# Altium PCB PCB.PcbDoc (part 2 of 4)
Units mm, origin at the board's own origin, x right, y up, seen from the top; angles counter-clockwise.
Board outline 147.57 x 62.6 mm, 4 copper layers (Top Layer, Layer 1, Layer 2, Bottom Layer), stack 1.586 mm thick; 192 components, 139 nets, 594 pads, 161 vias.
Unrouted connection lines stored in the file: 1.
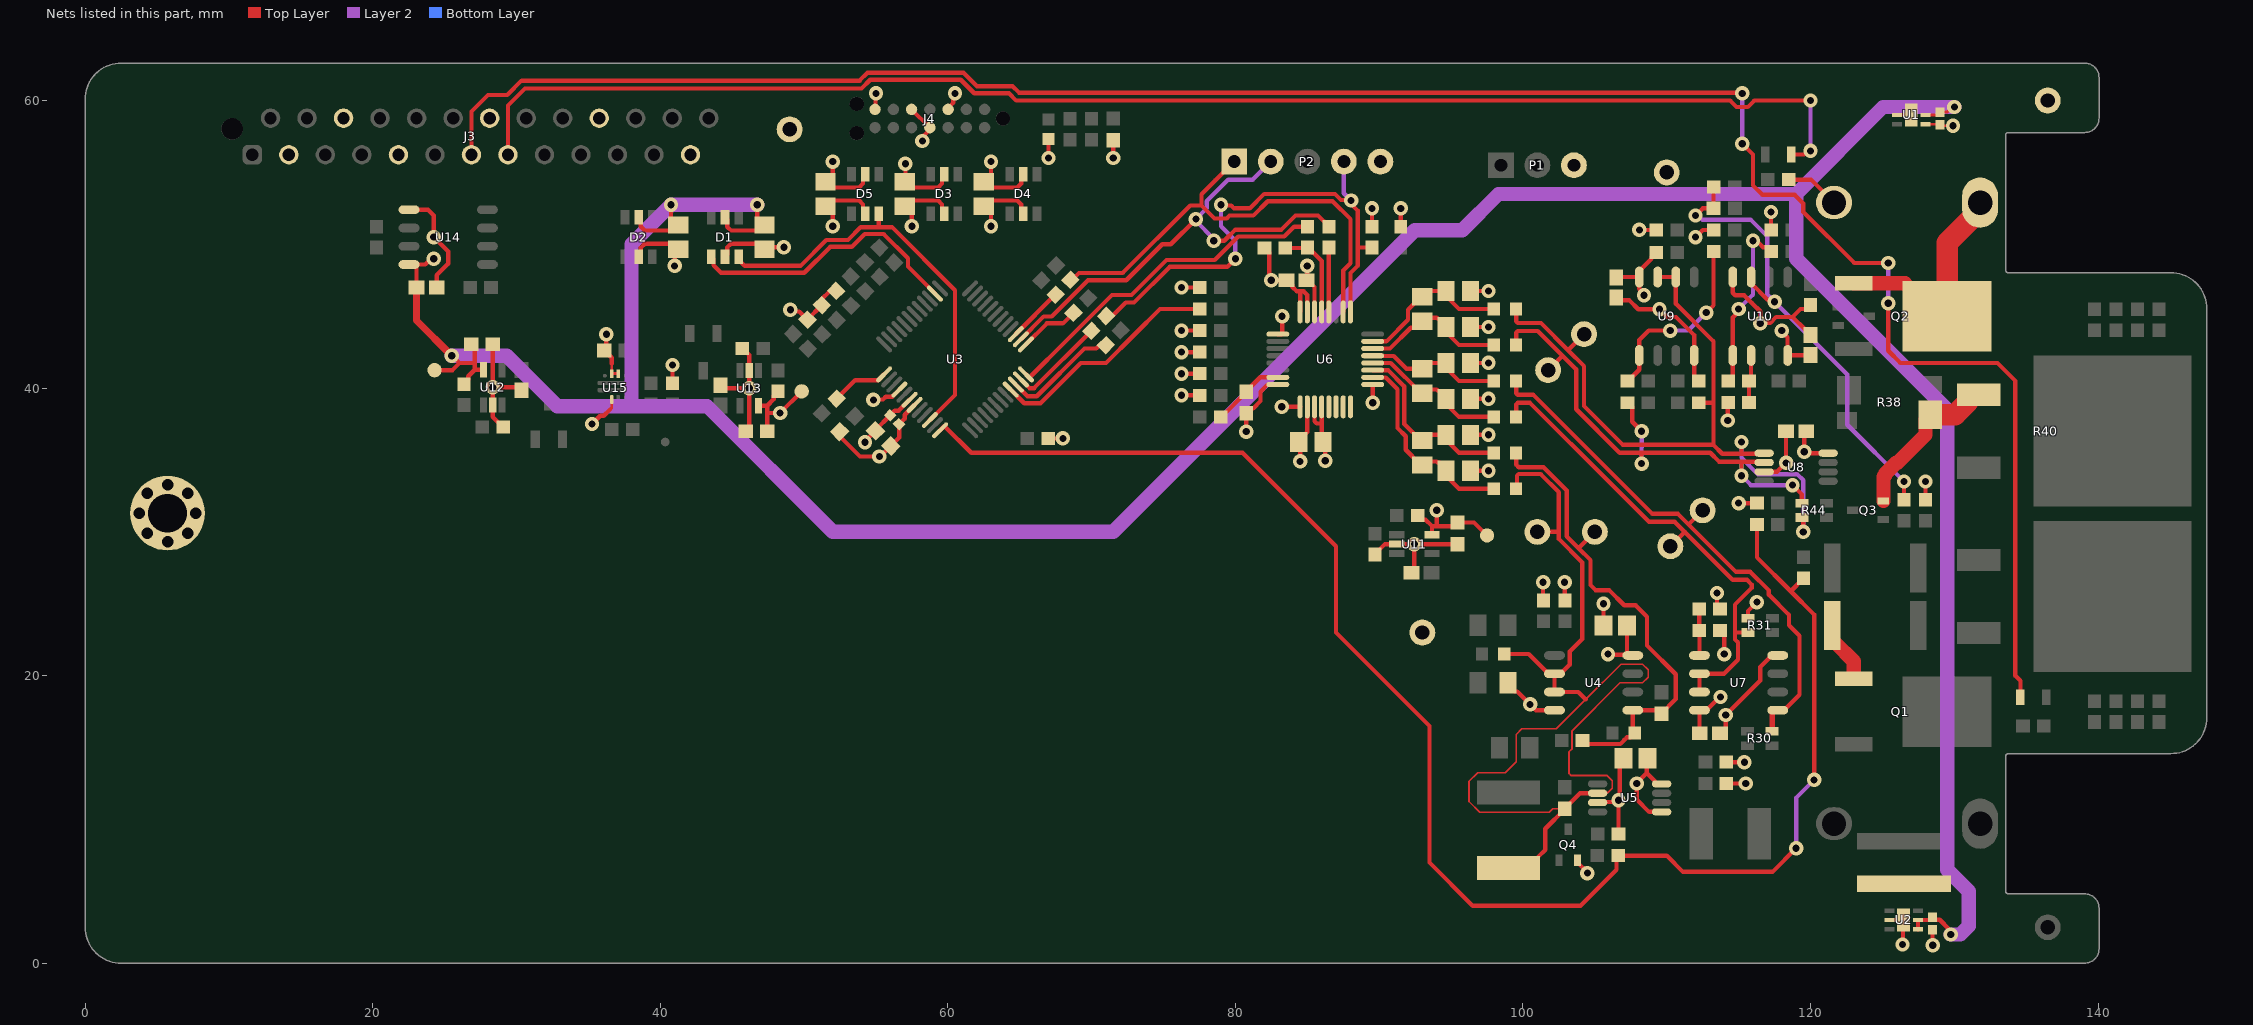
[diagram p4: the nets of this part, all layers, seen from the top]

## Footprints (in the part's own frame and the unit in brackets; to place one, negate y for a bottom-side part, rotate by r counter-clockwise, add the part's x,y. Pads: shape width x height; smd on the part's side, far side on the other; paste and mask are expansions set on the pad) (continued)
"TO-263 (TPAL0263) B" [mm] "D2-PAK, 3-Pads, Body 7,15x8,56mm (max), IPC Medium Density"
  rect 3x1.55 smd: 1(-6.65,2.54) 2(-6.65,-2.54)
  rect 11x10.5 smd: 3(2.65,0)
  silkscreen extent -6.77,-5.2 -3.25,5.2, body extent -7.35,-5.2 7.95,5.2, height 4.8
"VQFN-10 (LM73100) MFG" [mm] "QFN, 10-Leads, Body 2,00x2,00mm, Pitch 0,45mm, Manufacture Recommended Guidelines"
  round 0.27 smd paste-1000 mask+0: 1(-1.05,0.7) 10(0.75,0.7)
  rrect40% 0.6x0.25 smd paste+0 mask+0: 2(-0.9,0.225) 3(-0.9,-0.225) 8(0.9,-0.225) 9(0.9,0.225)
  round 0.255 smd paste-1000 mask+0: 4(-0.75,-0.75) 7(0.75,-0.75)
  rrect33% 0.3x2.4 smd paste-1000 mask+0: 5(-0.25,0) 6(0.25,0)
  Top Layer region: 0.85,0.85 0.85,1.15 0.846,1.169 0.835,1.185 0.819,1.196 0.8,1.2 0.8,1.2 0.65,1.2 0.631,1.196 0.615,1.185 0.604,1.169 0.6,1.15 0.6,1.15 0.6,0.6 0.604,0.581 0.615,0.565 0.631,0.554 0.65,0.55 0.65,0.55 1.15,0.55 1.169,0.554 1.185,0.565 1.196,0.581 1.2,0.6 1.2,0.6 1.2,0.8 1.196,0.819 1.185,0.835 1.169,0.846 1.15,0.85 1.15,0.85
  Top Layer region: 0.85,-0.85 0.85,-1.15 0.846,-1.169 0.835,-1.185 0.819,-1.196 0.8,-1.2 0.8,-1.2 0.65,-1.2 0.631,-1.196 0.615,-1.185 0.604,-1.169 0.6,-1.15 0.6,-1.15 0.6,-0.6 0.604,-0.581 0.615,-0.565 0.631,-0.554 0.65,-0.55 0.65,-0.55 1.15,-0.55 1.169,-0.554 1.185,-0.565 1.196,-0.581 1.2,-0.6 1.2,-0.6 1.2,-0.8 1.196,-0.819 1.185,-0.835 1.169,-0.846 1.15,-0.85 1.15,-0.85
  Top Layer region: -0.85,-0.85 -0.85,-1.15 -0.846,-1.169 -0.835,-1.185 -0.819,-1.196 -0.8,-1.2 -0.8,-1.2 -0.65,-1.2 -0.631,-1.196 -0.615,-1.185 -0.604,-1.169 -0.6,-1.15 -0.6,-1.15 -0.6,-0.6 -0.604,-0.581 -0.615,-0.565 -0.631,-0.554 -0.65,-0.55 -0.65,-0.55 -1.15,-0.55 -1.169,-0.554 -1.185,-0.565 -1.196,-0.581 -1.2,-0.6 -1.2,-0.6 -1.2,-0.8 -1.196,-0.819 -1.185,-0.835 -1.169,-0.846 -1.15,-0.85 -1.15,-0.85
  Top Layer region: -0.85,0.85 -0.85,1.15 -0.843,1.175 -0.825,1.193 -0.8,1.2 -0.8,1.2 -0.65,1.2 -0.631,1.196 -0.615,1.185 -0.604,1.169 -0.6,1.15 -0.6,1.15 -0.6,0.6 -0.604,0.581 -0.615,0.565 -0.631,0.554 -0.65,0.55 -0.65,0.55 -1.15,0.55 -1.169,0.554 -1.185,0.565 -1.196,0.581 -1.2,0.6 -1.2,0.6 -1.2,0.8 -1.193,0.825 -1.175,0.843 -1.15,0.85 -1.15,0.85
  silkscreen extent -1.62,1.37 -1.38,1.62, body extent -1.05,-1.05 1.05,1.05, height 1

## Part data
C1 C2 C3: library part CMP-045-000014-12, "MLCC 100nF 0402 16V X7R ±10%", Dielectric=X7R, LCSC Part Number=C1525, Manufacturer=Samsung, Package=0402, Tolerance=±10%, Voltage=16V, ComponentLink1Description=Datasheet, ComponentLink1URL=https://datasheet.lcsc.com/szlcsc/Samsung-Electro-Mechanics-CL05C100JB5NNNC_C32949.pdf, Populate=CRITICAL
C4 C6: library part CMP-047-000001-7, "MLCC 100nF 50V 0805 X7R ±10%", Dielectric=X7R, LCSC Part Number=C49678, Manufacturer=Yageo, Package=0805, Tolerance=±10%, Voltage=50V, ComponentLink1Description=Datasheet, ComponentLink1URL=https://datasheet.lcsc.com/szlcsc/YAGEO-CC0603KRX7R9BB104_C14663.pdf, Populate=CRITICAL
C5: library part CMP-001-00001-1, "Film Capacitor, Polyphenylene Sulfide, 50V, 2% +Tol, 2% -Tol, 0.1uF, Surface Mount, 1913", Dielectric=Film, LCSC Part Number=C569828, Max Operating Temperature=125°C, Min Operating Temperature=-55°C, Package=1913, Tolerance=2%, Voltage=50V, ComponentLink1Description=Datasheet, ComponentLink1URL=https://jlcpcb.com/api/file/downloadByFileSystemAccessId/8588893398266204160, Populate=CRITICAL
C7: library part CMP-001-00007-1, "Film Capacitor, Polyphenylene Sulfide, 50V, 2% +Tol, 2% -Tol, 0.22uF, Surface Mount, 2416", Dielectric=Film, LCSC Part Number=C569856, Max Operating Temperature=125°C, Min Operating Temperature=-55°C, Package=2416, Tolerance=2%, Voltage=50V, ComponentLink1Description=Datasheet, ComponentLink1URL=https://jlcpcb.com/api/file/downloadByFileSystemAccessId/8590903044286726144, Populate=TEST
C8: library part CMP-00124-1, "MLCC 1nF 0603 50V C0G ±5%", Dielectric=C0G, LCSC Part Number=C163508, Manufacturer=Samsung, Max Operating Temperature=125°C, Min Operating Temperature=-55°C, Package=0603, Tolerance=5%, Voltage=50V, ComponentLink1Description=Datasheet, ComponentLink1URL=https://datasheet.lcsc.com/szlcsc/Samsung-Electro-Mechanics-CL05C100JB5NNNC_C32949.pdf, Populate=CRITICAL
C9: library part CMP-045-000015-10, "MLCC 100pF 0603 50V C0G ±0.1pF", Dielectric=C0G, LCSC Part Number=C14858, Manufacturer=Samsung, Package=0603, Tolerance=±0.1pF, Voltage=50V, ComponentLink1Description=Datasheet, ComponentLink1URL=https://datasheet.lcsc.com/szlcsc/Samsung-Electro-Mechanics-CL05C100JB5NNNC_C32949.pdf, Populate=CRITICAL
C10 C13 C20 C21 C22 C31 C32 C33 C40: library part CMP-047-000000-9, "MLCC 100nF 50V 0603 X7R ±10%", Dielectric=X7R, LCSC Part Number=C14663, Manufacturer=Yageo, Package=0603, Tolerance=±10%, Voltage=50V, ComponentLink1Description=Datasheet, ComponentLink1URL=https://datasheet.lcsc.com/szlcsc/YAGEO-CC0603KRX7R9BB104_C14663.pdf, Populate=CRITICAL
C11: library part CMP-001-00002-2, "MLCC 330nF 0805 50V X7R ±10%", Dielectric=X7R, LCSC Part Number=C73142, Manufacturer=Samsung, Max Operating Temperature=125°C, Min Operating Temperature=-55°C, Package=0805, Tolerance=10%, Voltage=50V, ComponentLink1Description=Datasheet, ComponentLink1URL=https://datasheet.lcsc.com/szlcsc/Samsung-Electro-Mechanics-CL05C100JB5NNNC_C32949.pdf, Populate=CRITICAL
C12: library part CMP-00130-1, "MLCC 22uF 0603 6V3 X5R ±20%", Dielectric=X5R, LCSC Part Number=C59461, Manufacturer=Samsung, Max Operating Temperature=85°C, Min Operating Temperature=-55°C, Package=0603, Tolerance=20%, Voltage=6.3V, ComponentLink1Description=Datasheet, ComponentLink1URL=https://datasheet.lcsc.com/szlcsc/Samsung-Electro-Mechanics-CL05C100JB5NNNC_C32949.pdf, Populate=CRITICAL
C14 C16 C17 C19 C23 C25: library part CMP-00129-1, "MLCC 10nF 0805 50V C0G ±1%", Dielectric=C0G, LCSC Part Number=C441760, Manufacturer=Murata, Max Operating Temperature=125°C, Min Operating Temperature=-55°C, Package=0805, Tolerance=1%, Voltage=50V, ComponentLink1Description=Catalogue, ComponentLink1URL=https://jlcpcb.com/api/file/downloadByFileSystemAccessId/8588936099087454208, ComponentLink2Description="Product Page", ComponentLink2URL=https://www.murata.com/en-global/products/productdetail.aspx?partno=GRM2195C1H103JA01%23, ComponentLink3Description=Datasheet, ComponentLink3URL=https://search.murata.co.jp/Ceramy/image/img/A01X/G101/ENG/GRM2195C1H103JA01-01A.pdf, Populate=CRITICAL
C15 C18 C24: library part CMP-001-00005-1, "MLCC 33nF 0805 50V C0G ±5%", Dielectric=C0G, LCSC Part Number=C1518212, Manufacturer=Murata, Max Operating Temperature=125°C, Min Operating Temperature=-55°C, Package=0805, Tolerance=5%, Voltage=50V, ComponentLink1Description=Catalogue, ComponentLink1URL=https://jlcpcb.com/api/file/downloadByFileSystemAccessId/8588936099087454208, ComponentLink2Description="Product Page", ComponentLink2URL=https://www.murata.com/products/productdetail?partno=GRM2165C1H333JA01%23, ComponentLink3Description=Datasheet, ComponentLink3URL=https://search.murata.co.jp/Ceramy/image/img/A01X/G101/ENG/GRM2165C1H333JA01-01A.pdf, Populate=CRITICAL
C26 C27 C28 C29 C30: library part CMP-00100-3, "MLCC 100nF 0805 100V X7R ±10%", Dielectric=X7R, LCSC Part Number=C28233, Manufacturer=Samsung, Package=0805, Tolerance=±10%, Voltage=100V, ComponentLink1Description=Datasheet, ComponentLink1URL=https://datasheet.lcsc.com/szlcsc/Samsung-Electro-Mechanics-CL05C100JB5NNNC_C32949.pdf, Populate=CRITICAL
C34 C35 C36 C38: library part CMP-045-000002-11, "MLCC 1uF 0603 50V X5R ±10%", Dielectric=X5R, LCSC Part Number=C15849, Manufacturer=Samsung, Package=0603, Tolerance=±10%, Voltage=50V, ComponentLink1Description=Datasheet, ComponentLink1URL=https://datasheet.lcsc.com/szlcsc/Samsung-Electro-Mechanics-CL05C100JB5NNNC_C32949.pdf, Populate=CRITICAL
C37: library part CMP-014-000007-7, "MLCC 4.7uF 0603 16V X5R ±10%", Dielectric=X5R, LCSC Part Number=C19666, Manufacturer=Samsung, Package=0603, Tolerance=±10%, Voltage=16V, ComponentLink1Description=Datasheet, ComponentLink1URL=https://datasheet.lcsc.com/szlcsc/Samsung-Electro-Mechanics-CL05C100JB5NNNC_C32949.pdf, Populate=CRITICAL
C39 C41: library part CMP-045-000000-10, "MLCC 1nF 0603 50V X7R ±10%", Dielectric=X7R, LCSC Part Number=C1588, Manufacturer=Samsung, Package=0603, Tolerance=±10%, Voltage=50V, ComponentLink1Description=Datasheet, ComponentLink1URL=https://datasheet.lcsc.com/szlcsc/Samsung-Electro-Mechanics-CL05C100JB5NNNC_C32949.pdf, Populate=CRITICAL
D1 D2 D3 D4 D5: library part CMP-000039-5, "TVS Diode Array Low Capacitance SOT23-6", Breakdown Voltage=6V, Capacitance=3.5pF, Case/Package=SOT-23-6, Clamping Voltage=17V, LCSC Part Number=C7519, Leakage Current=150nA, Manufacturer="ST Microelectronics", Max Operating Temperature=125°C, Min Operating Temperature=-40°C, Peak Pulse Current=5A, ComponentLink1Description=Datasheet, ComponentLink1URL=https://www.st.com/resource/en/datasheet/usblc6-2.pdf, Data Rate=480Mbps, Placement=CRITICAL, RoHS Compliant=Yes
D6 D7: library part CMP-022-000003-4, "Schottky Barrier Diode Common Cathode 30V 200mA ON Semi", Forward Current=200mA, LCSC Part Number=C14308, Reverse Voltage=30V, ComponentLink1Description=Datasheet, ComponentLink1URL=https://datasheet.lcsc.com/szlcsc/ON-Semicon-ON-SBAT54CLT1G_C124141.pdf, Placement=CRITICAL
DS1: library part CMP-007-00001-1, "LED 0603 SMT Green", Colour=Green, LCSC Part Number=C2986059, Manufacturer=Everlight, Maximum Forward Current=25mA, Nominal Forward Voltage=3V3, Package=0603, ComponentLink1Description=Datasheet, ComponentLink1URL=https://datasheet.lcsc.com/szlcsc/Everlight-Elec-19-217-GHC-YR1S2-3T_C72043.pdf, Placement=CRITICAL
DS2: library part CMP-035-000001-5, "LED 0603 SMT Red", Colour=Red, LCSC Part Number=C2286, Manufacturer=Hubei, Maximum Forward Current=20mA, Nominal Forward Voltage=2V0, Package=0603, ComponentLink1Description=Datasheet, ComponentLink1URL=https://datasheet.lcsc.com/szlcsc/Hubei-KENTO-Elec-KT-0603R_C2286.pdf, Placement=CRITICAL
F2 F3: library part CMP-00144-1, "Thermistor PTC 42 Ohm 20% 2-Pin 0805 Surface Mount Solder Pad T/R Automotive", Current=590mA, LCSC Part Number=C341812, Max Operating Temperature=105°C, Min Operating Temperature=-40°C, Package=0805, Resistance=42, Voltage=20V, ComponentLink1Description=Datasheet, ComponentLink1URL=https://jlcpcb.com/api/file/downloadByFileSystemAccessId/8588911221270073344, Placement=CRITICAL
H1: library part CMP-00028-00005-3, "M2.5 Mounting Hole", Size=M2.5
J1 J2: library part CMP-00119-1, "Female PCB Terminal 6.4x0.81mm Tabs", LCSC Part Number=C3029552, ComponentLink1Description="Product Page", ComponentLink1URL=https://www.keyelco.com/product.cfm/Horizontal-Entry/3547/product_id/681, ComponentLink2Description=Drawing, ComponentLink2URL=https://www.keyelco.com/product-pdf.cfm?p=681, ComponentLink3Description=Catalogue, ComponentLink3URL=https://www.keyelco.com/userAssets/file/M65p61.pdf, Placement=CRITICAL
J3: library part CMP-00118-2, "Board Connector, 26 Contact(s), 2 Row(s), Male, Straight, 0.1 inch Pitch, Solder Kinked Leads Terminal, Locking, Red Insulator, Plug", LCSC Part Number=C19131003, ComponentLink1Description="Product Page", ComponentLink1URL=https://www.we-online.com/en/components/products/BTB_WR-MM_MINIMODULE_THT?sq=690367182672#690367182672, ComponentLink2Description=Datasheet, ComponentLink2URL=https://www.we-online.com/components/products/datasheet/690367182672.pdf, Placement=CRITICAL
J4: library part CMP-00121-2, "14-Pin Plug-of-nails connector for SWD Footprint", ComponentLink1Description=Datasheet, ComponentLink1URL=https://www.tag-connect.com/wp-content/uploads/bsk-pdf-manager/TC2070-IDC-NL_Datasheet_12.pdf, ComponentLink2Description="Product Page", ComponentLink2URL=https://www.tag-connect.com/product/tc2070-idc-nl-050, Placement=CRITICAL
P1: library part CMP-00149-2, "Pin Header 3 1 Vertical Male", LCSC Part Number=C2937625, ComponentLink1Description=Datasheet, ComponentLink1URL=https://jlcpcb.com/api/file/downloadByFileSystemAccessId/8588954567287443456, Placement=CRITICAL
P2: library part CMP-00148-2, "Pin Header 5 1 Vertical Male", LCSC Part Number=C492404, ComponentLink1Description=Datasheet, ComponentLink1URL=https://datasheet.lcsc.com/lcsc/2003191006_XFCN-PZ254V-11-06P_C492405.pdf, Placement=CRITICAL
Q1 Q2: library part CMP-00132-1, "Power Bipolar Transistor, 3A I(C), 100V V(BR)CEO, 1-Element, PNP, Silicon, Plastic/Epoxy, 2 Pin", Base Current=-1A, Collector Current=-3A, Collector-Base Voltage=-100V, Emitter-Base Voltage=-5V, LCSC Part Number=C2905365, Max Operating Temperature=160°C, Min Operating Temperature=-65°C, Collector-Emitter Voltage=-100V, ComponentLink1Description=Datasheet, ComponentLink1URL=https://mm.digikey.com/Volume0/opasdata/d220001/medias/docus/844/MJD32C_Rev4_Jun2012.pdf, Placement=CRITICAL
Q3 Q4 Q5: library part CMP-00131-1, "Mosfet, N-Ch, 60V, 0.3A, Sot-323 Rohs Compliant: Yes", Continous Drain Current=300mA, Drain Source Resistance=2, Drain Source Voltage=60V, Gate Source Voltage=±20V, LCSC Part Number=C151318, Max Operating Temperature=150°C, Min Operating Temperature=-65°C, ComponentLink1Description=Datasheet, ComponentLink1URL=https://jlcpcb.com/api/file/downloadByFileSystemAccessId/8586203582969860096, Mode=Enhancement, Placement=CRITICAL, Polarity=N-Channel
R1 R3 R4: library part CMP-009-00009-1, "Resistor 10M 0805 ±0.5% Thick Film Vishay", LCSC Part Number=C843972, Manufacturer=Vishay, Max Operating Temperature=155°C, Min Operating Temperature=-55°C, Package=0805, Power=100mW, Temperature Coefficient=±50ppm/°C, Tolerance=0.5%, Voltage Rating=150V, ComponentLink1Description=Datasheet, ComponentLink1URL=https://jlcpcb.com/api/file/downloadByFileSystemAccessId/8589808148883681280, Composition="Thick Film", Populate=CRITICAL
R2: library part CMP-00125-2, "Resistor 1M0 0603 ±0.1% Thin Film Yaego", LCSC Part Number=C326730, Manufacturer=Yaego, Max Operating Temperature=155°C, Min Operating Temperature=-55°C, Package=0603, Power=100mW, Temperature Coefficient=25ppm/K, Tolerance=0.1%, Voltage Rating=75V, ComponentLink1Description=Datasheet, ComponentLink1URL=https://jlcpcb.com/api/file/downloadByFileSystemAccessId/8588919467732840449, Composition="Thin Film", Populate=CRITICAL
R5 R13 R14 R15 R16 R26 R27 R28 R29 R41 R57: library part CMP-010-000293-9, "Resistor 10K 0603 ±1% Thick Film Uniroyal", LCSC Part Number=C25804, Manufacturer=Uniroyal, Package=0603, Power=0.1W, Temperature="-55 - 155°C", Temperature Coefficient=±100ppm/K, Tolerance=±1%, Working Voltage=75V, ComponentLink1Description=Datasheet, ComponentLink1URL=https://datasheet.lcsc.com/szlcsc/1811062009_UNI-ROYAL-Uniroyal-Elec-0603WAF1002T5E_C25804.pdf, Pin Count=2
  R5 R41 R57: Populate=CRITICAL
  R13 R14 R15 R16: Populate="IF NC"
  R26 R27 R28 R29: Populate=GPOUT
R6 R8 R35 R43 R45 R46 R47 R48 R49 R50 R51 R52 R53 R54 R97: library part CMP-010-000288-10, "Resistor 100K 0603 ±1% Thick Film Uniroyal", LCSC Part Number=C25803, Manufacturer=Uniroyal, Package=0603, Power=0.1W, Temperature="-55 - 155°C", Temperature Coefficient=±100ppm/K, Tolerance=±1%, Working Voltage=75V, ComponentLink1Description=Datasheet, ComponentLink1URL=https://datasheet.lcsc.com/szlcsc/1811062009_UNI-ROYAL-Uniroyal-Elec-0603WAF1002T5E_C25804.pdf, Pin Count=2
  R6 R8 R35 R43 R45 R46 R47 R48 R49 R50 R51 R52 R53 R54: Populate=CRITICAL
  R97: Populate=DNP
R7: library part CMP-009-00002-1, "Resistor 84K5 0603 ±0.1% Thin Film Yaego", LCSC Part Number=C705797, Manufacturer=Yaego, Max Operating Temperature=155°C, Min Operating Temperature=-55°C, Package=0603, Power=100mW, Temperature Coefficient=25ppm/K, Tolerance=0.1%, Voltage Rating=75V, ComponentLink1Description=Datasheet, ComponentLink1URL=https://jlcpcb.com/api/file/downloadByFileSystemAccessId/8588919467732840449, Composition="Thin Film", Populate=CRITICAL
R9: library part CMP-010-000382-2, "Resistor 330K 0603 ±1% Thick Film Uniroyal", LCSC Part Number=C23137, Manufacturer=Uniroyal, Package=0603, Power=0.1W, Temperature="-55 - 155°C", Temperature Coefficient=±100ppm/K, Tolerance=±1%, Working Voltage=75V, ComponentLink1Description=Datasheet, ComponentLink1URL=https://datasheet.lcsc.com/szlcsc/1811062009_UNI-ROYAL-Uniroyal-Elec-0603WAF1002T5E_C25804.pdf, Pin Count=2, Populate=CRITICAL
R10: library part CMP-010-000347-9, "Resistor 82K 0603 ±1% Thick Film Uniroyal", LCSC Part Number=C23254, Manufacturer=Uniroyal, Package=0603, Power=0.1W, Temperature="-55 - 155°C", Temperature Coefficient=±100ppm/K, Tolerance=±1%, Working Voltage=75V, ComponentLink1Description=Datasheet, ComponentLink1URL=https://datasheet.lcsc.com/szlcsc/1811062009_UNI-ROYAL-Uniroyal-Elec-0603WAF1002T5E_C25804.pdf, Pin Count=2, Populate=CRITICAL
R11 R12 R36 R37 R61 R62 R64 R65 R68 R69: library part CMP-010-000359-7, "Jumper 0603 1A Uniroyal", Current=1A, LCSC Part Number=C21189, Manufacturer=Uniroyal, Package=0603, Temperature="-55 - 155°C", ComponentLink1Description=Datasheet, ComponentLink1URL=https://datasheet.lcsc.com/szlcsc/1811062009_UNI-ROYAL-Uniroyal-Elec-0603WAF1002T5E_C25804.pdf, Pin Count=2
  R11 R36 R37 R61 R62 R64 R65: Populate=DNP
  R12 R69: Populate=CRITICAL
  R68: Populate=SPARE
R17 R18 R19 R20 R21 R22 R23 R55 R60 R67 R76 R77 R78 R79 R85 R86 R90 R91 R96: library part CMP-00128-3, "Resistor 47R 0603 ±1% Thick Film Uniroyal", LCSC Part Number=C23182, Manufacturer=Uniroyal, Max Operating Temperature=155°C, Min Operating Temperature=-55°C, Package=0603, Power=100mW, Temperature Coefficient=100ppm/K, Tolerance=1%, Voltage Rating=75V, ComponentLink1Description=Datasheet, ComponentLink1URL=https://datasheet.lcsc.com/szlcsc/1811062009_UNI-ROYAL-Uniroyal-Elec-0603WAF1002T5E_C25804.pdf, Composition="Thick Film", Populate=CRITICAL
R24 R25 R32 R34 R63 R66: library part CMP-009-00003-1, "Resistor 3K9 0603 ±0.1% Thin Film Yaego", LCSC Part Number=C728592, Manufacturer=Yaego, Max Operating Temperature=155°C, Min Operating Temperature=-55°C, Package=0603, Power=100mW, Temperature Coefficient=25ppm/K, Tolerance=0.1%, Voltage Rating=75V, ComponentLink1Description=Datasheet, ComponentLink1URL=https://jlcpcb.com/api/file/downloadByFileSystemAccessId/8588919467732840449, Composition="Thin Film", Populate=CRITICAL
R30 R31 R44: library part CMP-009-00004-9, "Resistor Array 100K,10K 0606 ±0.1% Thin Film Vishay", LCSC Part Number=C6733329, Max Operating Temperature=125°C, Min Operating Temperature=-55°C, Package=0606, Power=125mW, Temperature Coefficient=25ppm/K, Tolerance=±0.1%, Value 1=10K, Value 2=100K, Voltage Rating=100V, ComponentLink1Description=Datasheet, ComponentLink1URL=https://www.vishay.com/docs/28770/acasat.pdf, Composition="Thin Film", Populate=CRITICAL
R33 R42 R87 R88: library part CMP-010-000303-9, "Resistor 150K 0603 ±1% Thick Film Uniroyal", LCSC Part Number=C22807, Manufacturer=Uniroyal, Package=0603, Power=0.1W, Temperature="-55 - 155°C", Temperature Coefficient=±100ppm/K, Tolerance=±1%, Working Voltage=75V, ComponentLink1Description=Datasheet, ComponentLink1URL=https://datasheet.lcsc.com/szlcsc/1811062009_UNI-ROYAL-Uniroyal-Elec-0603WAF1002T5E_C25804.pdf, Pin Count=2, Populate=CRITICAL
R38: library part CMP-009-00005-3, "100mΩ 1W Current Sense Resistor ±0.1% ±15ppm/K 2512", Current Rating=3A, LCSC Part Number=C23067426, Max Operating Temperature=170°C, Min Operating Temperature=-55°C, Package=2512, Power=1W, Temperature Coefficient=±15ppm/K, Tolerance=±0.1%, ComponentLink1Description=Datasheet, ComponentLink1URL=https://s.resistor.today/shop/products/epdf/PCSR2512.pdf, Composition=Wirewound, Populate=CRITICAL
R39 R40: library part CMP-009-00007-1, "3.3Ω 35W 500V Planar Non-Inductive Power Resistor ±1% ±100ppm/℃ TO-263", LCSC Part Number=C22446548, Max Operating Temperature=150°C, Min Operating Temperature=-55°C, Package=TO-263, Power=35W, Temperature Coefficient=100ppm/K, Tolerance=±1%, Voltage Rating=500V, ComponentLink1Description=Datasheet, ComponentLink1URL=https://s.resistor.today/shop/products/epdf/TPAL0263.pdf, Populate=CRITICAL
R56 R71 R73: library part CMP-00137-1, "Resistor 510K 0603 ±1% Thick Film Uniroyal", LCSC Part Number=C23192, Manufacturer=Uniroyal, Max Operating Temperature=155°C, Min Operating Temperature=-55°C, Package=0603, Power=100mW, Temperature Coefficient=±100ppm/K, Tolerance=±1%, Voltage Rating=75V, ComponentLink1Description=Datasheet, ComponentLink1URL=https://datasheet.lcsc.com/szlcsc/1811062009_UNI-ROYAL-Uniroyal-Elec-0603WAF1002T5E_C25804.pdf, Composition="Thick Film", Populate=CRITICAL
R58 R59: library part CMP-00133-1, "Resistor 68R 2512 ±1% 1W Thick Film Uniroyal", LCSC Part Number=C50371, Max Operating Temperature=155°C, Min Operating Temperature=-55°C, Package=2512, Power=1W, Temperature="-55 - 155°C", Temperature Coefficient=±100ppm/K, Tolerance=±1%, Voltage Rating=200V, ComponentLink1Description=Datasheet, ComponentLink1URL=https://datasheet.lcsc.com/lcsc/1810301111_UNI-ROYAL-Uniroyal-Elec-25121WF100MT4E_C127692.pdf, Composition="Thick Film", Populate=CRITICAL
R70 R72: library part CMP-00138-2, "Resistor 1M6 0603 ±1% Thick Film Uniroyal", LCSC Part Number=C22770, Manufacturer=Uniroyal, Max Operating Temperature=155°C, Min Operating Temperature=-55°C, Package=0603, Power=100mW, Temperature Coefficient=±100ppm/K, Tolerance=±1%, Voltage Rating=75V, ComponentLink1Description=Datasheet, ComponentLink1URL=https://datasheet.lcsc.com/szlcsc/1811062009_UNI-ROYAL-Uniroyal-Elec-0603WAF1002T5E_C25804.pdf, Composition="Thick Film", Populate=CRITICAL
R74: library part CMP-010-000402-2, "Resistor 470K 0603 ±1% Thick Film Uniroyal", LCSC Part Number=C23178, Manufacturer=Uniroyal, Package=0603, Power=0.1W, Temperature="-55 - 155°C", Temperature Coefficient=±100ppm/K, Tolerance=±1%, Working Voltage=75V, ComponentLink1Description=Datasheet, ComponentLink1URL=https://datasheet.lcsc.com/szlcsc/1811062009_UNI-ROYAL-Uniroyal-Elec-0603WAF1002T5E_C25804.pdf, Pin Count=2, Populate=CRITICAL
R75: library part CMP-010-000411-2, "Resistor 270K 0603 ±1% Thick Film Uniroyal", LCSC Part Number=C22965, Manufacturer=Uniroyal, Package=0603, Power=0.1W, Temperature="-55 - 155°C", Temperature Coefficient=±100ppm/K, Tolerance=±1%, Working Voltage=75V, ComponentLink1Description=Datasheet, ComponentLink1URL=https://datasheet.lcsc.com/szlcsc/1811062009_UNI-ROYAL-Uniroyal-Elec-0603WAF1002T5E_C25804.pdf, Pin Count=2, Populate=CRITICAL
R80 R81: library part CMP-010-000300-9, "Resistor 120R 0603 ±1% Thick Film Uniroyal", LCSC Part Number=C22787, Manufacturer=Uniroyal, Package=0603, Power=0.1W, Temperature="-55 - 155°C", Temperature Coefficient=±100ppm/K, Tolerance=±1%, Working Voltage=75V, ComponentLink1Description=Datasheet, ComponentLink1URL=https://datasheet.lcsc.com/szlcsc/1811062009_UNI-ROYAL-Uniroyal-Elec-0603WAF1002T5E_C25804.pdf, Pin Count=2
  R80: Populate=DNP
  R81: Populate=SPARE
R82 R83 R84 R95: library part CMP-010-000405-2, "Resistor 4K7 0603 ±1% Thick Film Uniroyal", LCSC Part Number=C23162, Manufacturer=Uniroyal, Package=0603, Power=0.1W, Temperature="-55 - 155°C", Temperature Coefficient=±100ppm/K, Tolerance=±1%, Working Voltage=75V, ComponentLink1Description=Datasheet, ComponentLink1URL=https://datasheet.lcsc.com/szlcsc/1811062009_UNI-ROYAL-Uniroyal-Elec-0603WAF1002T5E_C25804.pdf, Populate=CRITICAL
R89: library part CMP-010-000404-2, "Resistor 47K 0603 ±1% Thick Film Uniroyal", LCSC Part Number=C25819, Manufacturer=Uniroyal, Package=0603, Power=0.1W, Temperature="-55 - 155°C", Temperature Coefficient=±100ppm/K, Tolerance=±1%, Working Voltage=75V, ComponentLink1Description=Datasheet, ComponentLink1URL=https://datasheet.lcsc.com/szlcsc/1811062009_UNI-ROYAL-Uniroyal-Elec-0603WAF1002T5E_C25804.pdf, Pin Count=2, Populate=CRITICAL
R92 R93: library part CMP-010-000308-11, "Resistor 1K0 0603 ±1% Thick Film Uniroyal", LCSC Part Number=C21190, Manufacturer=Uniroyal, Package=0603, Power=0.1W, Temperature="-55 - 155°C", Temperature Coefficient=±100ppm/K, Tolerance=±1%, Working Voltage=75V, ComponentLink1Description=Datasheet, ComponentLink1URL=https://datasheet.lcsc.com/szlcsc/1811062009_UNI-ROYAL-Uniroyal-Elec-0603WAF1002T5E_C25804.pdf, Pin Count=2, Populate=CRITICAL
R94: library part CMP-010-000313-12, "Resistor 1M0 0603 ±1% Thick Film Uniroyal", LCSC Part Number=C22935, Manufacturer=Uniroyal, Package=0603, Power=0.1W, Temperature="-55 - 155°C", Temperature Coefficient=±100ppm/K, Tolerance=±1%, Working Voltage=75V, ComponentLink1Description=Datasheet, ComponentLink1URL=https://datasheet.lcsc.com/szlcsc/1811062009_UNI-ROYAL-Uniroyal-Elec-0603WAF1002T5E_C25804.pdf, Pin Count=2, Populate=OPTIONAL
RT1: library part CMP-00120-2, "Thermal Jumper 1225 259mW/K 1.5kVAC", LCSC Part Number=C22414428, Voltage=1.5kVAC, Placement=CRITICAL
TP1 TP2 TP6 TP7 TP8 TP9 TP13: library part CMP-00140-2, "Keystone Test Point Insulated Ring Red", LCSC Part Number=C5199900, Placement=DNP
TP3 TP4 TP5 TP15: library part CMP-00028-00001-10, "Test Point Pad", Placement="NO BOM"
TP10 TP11 TP12 TP14: library part CMP-00028-00009-2, "Keystone Test Point Insulated Ring Black", LCSC Part Number=C238122, Placement=DNP
U1 U2: library part CMP-061-000004-3, "Digital Temperature Sensor ±0.2°C NV Memory 6-WSON -55 to 125°C", LCSC Part Number=C182074, Manufacturer="Texas Instruments", Max Operating Temperature=150°C, Min Operating Temperature=-55°C, Package=SON-6, ComponentLink1Description=Datasheet, ComponentLink1URL=https://www.ti.com/lit/ds/symlink/tmp116.pdf?ts=1635336236311&ref_url=https%253A%252F%252Fwww.google.com%252F, Interface=I2C,SMBus,2-Wire, Placement=CRITICAL, Resolution=16b
U3: library part CMP-00139-1, "MCU 32-bit ARM Cortex M0+ RISC 128KB Flash 1.8V/2.5V/3.3V 48-Pin LQFP Tray", LCSC Part Number=C432212, Max Operating Temperature=85°C, Min Operating Temperature=-40°C, ComponentLink1Description="Product Page", ComponentLink1URL=https://www.st.com/en/microcontrollers-microprocessors/stm32g071cb.html#documentation, ComponentLink2Description=Datasheet, ComponentLink2URL=https://www.st.com/resource/en/datasheet/stm32g071cb.pdf, ComponentLink3Description="Hardware Development", ComponentLink3URL=https://www.st.com/resource/en/application_note/an5096-getting-started-with-stm32g0-series-hardware-development-stmicroelectronics.pdf, Placement=CRITICAL
U4 U7 U9 U10: library part CMP-00126-1, "Operational Amplifier, 2 Func, 1500uV Offset-Max, CMOS, PDSO8", Input Bias Current=800pA, Input Offset Voltage=1.5mV, LCSC Part Number=C2878284, Max Operating Temperature=125°C, Min Operating Temperature=-55°C, Output Current=50mA, ComponentLink1Description=Datasheet, ComponentLink1URL=https://www.ti.com/lit/ds/symlink/tlc2272.pdf?ts=1754033641708&ref_url=https%253A%252F%252Fwww.ti.com%252Fproduct%252FTLC2272%253Futm_source%253Dgoogle%2526utm_medium%253Dcpc%2526utm_campaign%253Dasc-amps-null-44700045336317476_prodfolderdynamic-cpc-pf-go, Input Offset Current=800pA, Placement=CRITICAL, Rail to Rail=Yes, Single Supply=Yes, Supply Max=8V, Supply Min=-8V
U5: library part CMP-00123-3, "RMS to DC Converter, 1 Func, CMOS, PDSO8", LCSC Part Number=C679071, Max Operating Temperature=125°C, Max Supply Voltage=5.5V, Min Operating Temperature=-55°C, Min Supply Voltage=2.7V, ComponentLink1Description=Datasheet, ComponentLink1URL=https://www.analog.com/media/en/technical-documentation/data-sheets/1966fb.pdf, Placement=CRITICAL
U6: library part CMP-00127-3, "ADC, Delta-Sigma, 24-Bit, 1 Func, 12 Channel, Serial Access, PQFP32", LCSC Part Number=C2870171, Max Operating Temperature=125°C, Min Operating Temperature=-50°C, ComponentLink1Description=Datasheet, ComponentLink1URL=https://www.ti.com/lit/ds/symlink/ads124s08.pdf, ComponentLink2Description="Product Page", ComponentLink2URL=https://www.ti.com/product/ADS124S08/part-details/ADS124S08IPBSR, Placement=CRITICAL, Resolution=24, Sampling Rate=4ksps
U8: library part CMP-014-00000-1, "Low-Power, Single Supply, CMOS, Instrumentation Amplifier 8-VSSOP -55 to 125", LCSC Part Number=C2863664, Max Operating Temperature=125°C, Max Supply Voltage=5.5V, Min Operating Temperature=-55°C, Min Supply Voltage=2.5V, Output Current=48mA, ComponentLink1Description=Datasheet, ComponentLink1URL=https://www.ti.com/lit/ds/symlink/ina331.pdf?ts=1756763479272&ref_url=https%253A%252F%252Fwww.google.com%252F, Output Type=Push-Pull, Placement=CRITICAL
U11 U12 U13: library part CMP-00134-2, "Enhanced Product 50 mA, 24 V, 3.2 uA Supply Current, Low Dropout, Linear Regulator", Dropout Voltage=415mV, LCSC Part Number=C2865892, Max Input Voltage=24V, Max Operating Temperature=125°C, Max Output Current=50mA, Min Operating Temperature=-55°C, ComponentLink1Description=Datasheet, ComponentLink1URL=https://www.ti.com/cn/lit/ds/symlink/tps71501-ep.pdf?ts=1757343311963, Placement=CRITICAL
U14: library part CMP-00141-1, "+/-15 kV ESD protected, low power RS-485/RS-422 transceiver, [-55oC, 125oC] temperature range", LCSC Part Number=C283496, Max Operating Temperature=125°C, Min Operating Temperature=-55°C, ComponentLink1Description=Datasheet, ComponentLink1URL=https://www.st.com/resource/en/datasheet/st485ex.pdf, Placement=CRITICAL
U15: library part CMP-00143-2, "2.7V~23V 5.5A VQFN-10-HR(2x2) Power Distribution Switches ROHS", LCSC Part Number=C3210761, Max Operating Temperature=125°C, Max Supply Voltage=23V, Min Operating Temperature=-40°C, Min Supply Voltage=2.7V, Placement=CRITICAL

## Via types
v1: diameter 1, hole 0.5, Top Layer to Bottom Layer, tented both sides, 153 vias
v2: diameter 0.8, hole 0.8, Top Layer to Bottom Layer, tented both sides, 8 vias

## Nets (pads, with @x,y where several pads share a name; then routed paths per layer and width w, separated by ;. In a path a pad name is that pad's centre, name@x,y a point inside that pad or via, vN(x,y) a via of type N, cw(c..) or ccw(c..) an arc to the next point about the centre after c; other vN are vias at no path point)
3V3: C3.1 C10.1 C28.2 C29.2 C30.2 C36.1 C37.1 D3.5 D4.5 D5.5 J4.3 R13.1 R14.1 R74.1 R82.1 R83.1 R84.1 TP5.1 U3.4 U3.6 U6.15 U6.16 U13.5 | length 44
  Top Layer w0.3: U13.5@46.835,38.77 47.435,38.77 ; C36.1@47.435,36.995 47.435,38.22 ; R74.1@48.185,39.77 47.885,39.47 47.885,39.22 47.435,38.77 ; v1@48.331,38.27 47.486,38.27 47.435,38.22 ; v1(48.335,38.27) TP5.1@49.835,39.77 ; v1(49.05,45.45) 49.172,45.328 49.672,45.328 R82.1@50.237,44.763 R83.1@51.237,45.763 51.237,46.187 51.813,46.763 R84.1@52.237,46.763 ; v1(52,51.25) 52,52.2 51.55,52.65 C30.2@51.5,52.65 51.892,53.042 53.833,53.042 54.1,52.775 54.1,52.275 D5.5@54.25,52.125 ; v1(54.24,36.24) 54.24,36.301 C37.1@54.97,37.03 54.97,37.092 C3.1@55.989,38.111 56.311,38.433 56.58,38.433 U3.6@57.336,39.189 ; v1(54.822,39.178) 54.852,39.209 55.492,39.209 55.676,39.393 56.126,39.393 U3.4@56.629,39.896 ; v1(57.5,51.25) 57.5,52.2 57.05,52.65 C28.2@57,52.65 57.392,53.042 59.333,53.042 59.6,52.775 59.6,52.275 D3.5@59.75,52.125 ; J4.3@60.02,59.385 60.02,59.492 60.366,59.838 60.366,60.366 v1(60.5,60.5) ; v1(63,51.25) 63,52.2 62.55,52.65 C29.2@62.5,52.65 62.892,53.042 64.833,53.042 65.1,52.775 65.1,52.275 D4.5@65.25,52.125 ; v1(76.25,47) R13.1@77.525,47 ; R14.1@82.025,49.75 82.05,49.75 82.35,49.45 82.35,47.839 82.5,47.689 v1(82.5,47.5) C10.1@83.55,47.5 ; C10.1@83.625,47.5 83.95,47.175 83.95,47.051 84.276,46.725 84.513,46.725 ; U6.16@84.5,45.3 84.5,46.712 84.513,46.725 ; U6.15@85,45.3 85,46.475 84.75,46.725 84.513,46.725 ; 47.435,38.22 47.435,38.77
5V0A: C4.2 C6.2 C11.1 C13.1 C20.1 C21.1 C22.1 C34.1 R1.1 R5.1 R6.1 R9.1 R33.1 R42.1 R70.1 R95.1 TP3.1 U4.8 U5.7 U6.26 U7.8 U8.7 U9.8 U10.8 U11.5 | length 51.1
  Top Layer w0.3: v1(84.5,34.9) 84.5,36.15 C11.1@84.4,36.25 84.4,36.35 85,36.95 U6.26@85,38.7 ; R70.1@92.675,31.15 92.975,30.85 93.225,30.85 93.675,30.4 ; U11.5@93.675,29.8 93.675,30.4 ; v1(94,31.5) 94,30.4 ; C34.1@95.45,30.4 94,30.4 ; C34.1@95.45,30.65 96.6,30.65 TP3.1@97.5,29.75 ; R1.1@98.967,19.5 98.967,19.35 99.417,18.9 99.6,18.9 100.905,17.595 U4.8@102.192,17.595 ; v1(102.9,26.5) 102.9,25.242 R9.1@102.917,25.225 ; U5.7@105.192,11.175 105.231,11.213 106.524,11.213 v1(106.648,11.338) ; C4.2@105.592,23.5 105.6,23.508 v1(105.6,25) ; C21.1@106.5,47.7 106.525,47.725 U9.8@108.095,47.725 ; R5.1@106.642,9 106.648,9.006 v1(106.648,11.338) ; C6.2@107.007,14.253 106.737,13.984 106.737,11.427 v1(106.648,11.338) ; v1(108.416,46.459) 108.416,46.579 108.095,46.9 U9.8@108.095,47.725 ; R42.1@109.245,49.429 108.945,49.129 108.945,49 108.095,48.15 U9.8@108.095,47.725 ; C13.1@112.3,16 112.275,16.025 U7.8@112.275,17.595 112.761,17.595 113.681,18.515 v1(113.743,18.515) ; R33.1@113.706,23.134 114,22.839 v1(114,21.5) ; R6.1@114.142,12.5 v1(115.5,12.5) ; U10.8@114.595,47.725 114.595,46.626 114.771,46.45 115.394,46.45 115.95,45.894 116.5,45.344 v1(116.5,44.5) 116.544,44.543 117.2,44.543 117.606,44.95 118.75,44.95 ; U8.7@116.775,34.175 117.675,34.175 v1(118.3,34.8) C20.1@118.3,37 ; C22.1@120,43.7 120,43.775 119.675,44.1 119.6,44.1 118.75,44.95 ; R95.1@120,45.775 119.732,45.507 119.307,45.507 118.75,44.95 ; 93.675,30.4 94,30.4
  other v1: 100.5,18
5V0D: C1.1 C2.1 C26.2 C27.2 C35.1 C40.1 D1.5 D2.5 R72.1 TP4.1 U1.5 U2.4 U2.5 U12.5 U14.8 | length 233.4
  Top Layer w0.2: U1.5@127.995,59 128.81,59 C1.1@129,59.19 129.483,59.19 129.84,59.547 v1(130.003,59.547)
  Top Layer w0.3: U14.8@22.525,48.595 U14.8@22.869,48.595 ; C40.1@23.05,47 23.05,48.414 U14.8@22.869,48.595 ; v1(24.25,49) 24.061,49 23.656,48.595 U14.8@22.869,48.595 ; TP4.1@24.3,41.25 25.545,41.25 26.045,41.75 ; v1(25.5,42.25) 25.545,42.25 26.045,41.75 ; R72.1@26.35,40.275 26.65,40.575 26.65,40.825 27.1,41.275 ; C35.1@27.1,43.05 27.1,41.75 ; U12.5@27.7,41.275 27.1,41.275 ; D2.5@38.5,51.875 38.65,51.725 38.65,51.225 38.917,50.958 40.858,50.958 C27.2@41.25,51.35 41.2,51.35 40.75,51.8 v1(40.75,52.75) ; D1.5@44.5,51.875 44.65,51.725 44.65,51.225 44.917,50.958 46.858,50.958 C26.2@47.25,51.35 47.2,51.35 46.75,51.8 v1(46.75,52.75) ; U2.4@127.47,2.358 U2.5@127.47,3.008 128.305,3.008 128.475,3.178 128.635,3.018 128.982,3.018 129.616,2.384 129.616,2.134 v1(129.75,2) ; 26.045,41.75 27.1,41.75 ; 27.1,41.275 27.1,41.75
  Top Layer w0.5: C40.1@23.05,47 23.05,44.7 v1(25.5,42.25)
  Layer 2 w1: v1(25.5,42.25) 29.325,42.25 32.825,38.75 38,38.75 ; v1(46.75,52.75) v1(40.75,52.75) 38,50 38,38.75 ; v1(129.75,2) 130.414,2 131,2.586 131,5 129.5,6.5 129.5,38.5 119,49 119,53.5 ; v1(130.003,59.547) 125.047,59.547 119,53.5 ; 38,38.75 43.25,38.75 52,30 71.5,30 92.475,50.975 95.775,50.975 98.3,53.5 119,53.5
\RST: D1.3 D5.6 U3.10 | length 29
  Top Layer w0.3: D1.3@45.45,49.125 45.45,48.925 45.875,48.5 49.75,48.5 51.55,50.3 53.05,50.3 53.947,51.197 55.2,51.197 ; D5.6@55.2,52.125 55.2,51.197 ; U3.10@58.75,37.775 60.5,39.525 60.5,46.811 56.114,51.197 55.2,51.197
ADC_AIN0: C18.2 C19.2 R34.2 U6.7 | length 10.8
  Top Layer w0.3: U6.7@89.55,43.25 90.5,43.25 92,44.75 92,45.45 92.9,46.35 C18.2@93,46.35 92.988,46.362 93.375,46.75 C19.2@94.65,46.75 ; C19.2@94.65,46.5 94.65,46.4 95.55,45.5 R34.2@97.975,45.5
ADC_AIN1: C17.1 C18.1 R32.2 U6.6 | length 10.1
  Top Layer w0.3: U6.6@89.55,42.75 90.75,42.75 92.2,44.2 92.55,44.2 C18.1@93,44.65 93.25,44.9 94,44.9 94.1,44.8 94.2,44.8 94.65,44.35 C17.1@94.65,44.25 ; C17.1@94.65,44 94.65,43.9 95.55,43 R32.2@97.975,43
ADC_AIN2: C24.2 C25.2 R66.2 U6.5 | length 9.5
  Top Layer w0.3: U6.5@89.55,42.25 89.56,42.24 90.22,42.24 90.23,42.23 91.02,42.23 91.9,41.35 C24.2@93,41.35 ; C24.2@92.975,41.35 93.375,41.75 C25.2@94.65,41.75 ; C25.2@94.65,41.5 94.65,41.4 95.55,40.5 R66.2@97.975,40.5
ADC_AIN3: C23.1 C24.1 R63.2 U6.4 | length 10.2
  Top Layer w0.3: U6.4@89.55,41.75 90.8,41.75 92.9,39.65 C24.1@93,39.65 93.25,39.9 94,39.9 94.1,39.8 94.2,39.8 94.65,39.35 C23.1@94.65,39.25 ; C23.1@94.65,39 94.65,38.9 95.55,38 R63.2@97.975,38
ADC_AIN4: C15.2 C16.2 R25.2 U6.3 | length 12.6
  Top Layer w0.3: U6.3@89.55,41.25 90.621,41.25 91.75,40.121 91.75,37.5 92.9,36.35 C15.2@93,36.35 ; C15.2@92.988,36.362 93.375,36.75 C16.2@94.65,36.75 ; C16.2@94.65,36.5 94.65,36.4 95.55,35.5 R25.2@97.975,35.5
ADC_AIN5: C14.1 C15.1 R24.2 U6.2 | length 14
  Top Layer w0.3: U6.2@89.55,40.75 89.56,40.74 90.452,40.74 91.27,39.922 91.27,37.23 91.85,36.65 91.85,35.706 92.3,35.256 92.3,35.25 92.9,34.65 C15.1@93,34.65 93.25,34.9 94,34.9 94.1,34.8 94.2,34.8 94.65,34.35 C14.1@94.65,34.25 ; C14.1@94.65,34 94.65,33.9 95.55,33 R24.2@97.975,33
ADC_D\R\D\Y\: R23.1 U3.24 | length 24
  Top Layer w0.3: U3.24@65.432,40.957 65.664,40.725 68.285,43.346 71.414,46.475 72.775,46.475 74.1,47.8 75.21,48.91 78.566,48.91 80.196,50.54 83.398,50.54 84.083,51.225 R23.1@85,51.225
ADC_R\S\T\: R22.1 U3.21 | length 16.3
  Top Layer w0.3: U3.21@64.371,39.896 65.318,38.95 66.45,38.95 69.25,41.75 71,41.75 72.967,43.717 74.75,45.5 R22.1@77.525,45.5
ADC_REFN0: U6.29
ADC_REFN1: U6.31
ADC_REFP0: U6.30
ADC_REFP1: U6.32
ADC_SPI.\CS: R17.1 U3.23 | length 6.8
  Top Layer w0.3: U3.23@65.079,40.603 65.682,40 66,40 R17.1@69.97,43.97
ADC_SPI.MISO: P2.2 R20.1 U3.26 | length 33.7
  Top Layer w0.3: U3.26@65.079,43.397 66.662,44.98 67.23,44.98 69.75,47.5 72.411,47.5 74.911,50 75.5,50 v1(77.25,51.75) ; v1(78.5,50.25) 79.228,50.25 79.998,51.02 83.199,51.02 84.179,52 85.75,52 86.5,51.25 R20.1@86.5,51.225
  Layer 2 w0.3: v1@77.25,51.625 78.5,50.375 v1(78.5,50.25) ; v1(77.25,51.75) 78,52.5 78,53 79.5,54.5 81.21,54.5 P2.2@82.46,55.75
ADC_SPI.MOSI: R19.1 U3.27 | length 3.9
  Top Layer w0.3: U3.27@64.725,43.75 67.475,46.5 R19.1@67.5,46.5
ADC_SPI.SCLK: R18.1 U3.25 | length 4.2
  Top Layer w0.3: U3.25@65.432,43.043 66.889,44.5 68,44.5 R18.1@68.737,45.237
ADC_START: R21.1 U3.22 | length 8.1
  Top Layer w0.3: U3.22@64.725,40.25 65.545,39.43 66.18,39.43 69.5,42.75 70.326,42.75 70.563,42.987 R21.1@70.987,42.987
ADC_VREF: C12.1 R12.1 U6.23 | length 5.1
  Top Layer w0.3: R12.1@79.025,38 80.75,39.725 80.75,39.775 81.725,40.75 U6.23@82.95,40.75
ADC_VREF_2V0: R33.2 R35.1 U7.5 | length 3.2
  Top Layer w0.3: R33.2@112.256,23.134 112.256,23.33 R35.1@112.256,24.634 ; U7.5@112.275,21.405 R33.2@112.275,23.134
AUX_5VEN: R90.1 U3.1 | length 4
  Top Layer w0.3: R90.1@52.263,39.263 53.55,40.55 55.161,40.55 U3.1@55.568,40.957
BATT_SENSE_N: F3.2 J3.15 | length 100.7
  Top Layer w0.3: J3.15@29.405,56.23 29.405,59.655 30.594,60.844 54,60.844 54.606,61.45 60.893,61.45 61.843,60.5 64.25,60.5 64.75,60 114.406,60 114.856,59.55 115.644,59.55 116.094,60 v1(120,60) ; F3.2@118.65,56.25 119.561,56.25 119.811,56.5 v1(120,56.5)
  Layer 2 w0.3: v1(120,56.5) v1(120,60)
BATT_SENSE_P: F2.2 J3.13 | length 149.8
  Top Layer w0.3: J3.13@26.865,56.23 26.865,59.232 28.022,60.389 29.361,60.389 30.358,61.386 53.864,61.386 54.408,61.93 61.092,61.93 62.022,61 64.5,61 64.95,60.55 115.2,60.55 v1(115.25,60.5) ; v1(115.25,57) 116,56.25 116,54.1 116.65,53.45 118.894,53.45 119.5,52.844 119.5,52.25 123.05,48.7 v1(125.4,48.7) ; v1(125.4,45.9) 125.4,42.6 126.25,41.75 133,41.75 134.25,40.5 134.25,20 134.6,19.65 F2.2@134.6,18.5
  Layer 2 w0.3: v1(115.25,57) v1(115.25,60.5) ; v1(125.4,45.9) v1(125.4,48.7)
C\S\_TERM: P2.4 R16.1 R17.2 U6.9 | length 36.7
  Top Layer w0.3: R17.2@71.013,45.013 71.437,45.013 72.373,45.948 72.948,45.948 75.43,48.43 79.43,48.43 v1(80,49) ; v1(79,52.75) 79.054,52.696 79.71,52.696 79.906,52.5 81,52.5 82,53.5 86.932,53.5 87.344,53.088 88.009,53.088 v1(88.048,53.048) 87.954,52.954 87.929,52.929 88.5,52.358 88.5,49.75 ; U6.9@88,45.3 88,48 88.5,48.5 88.5,49.75 ; R16.1@89.5,49.775 88.525,49.775 88.5,49.75
  Layer 2 w0.3: v1(79,52.75) 79,51.25 80,50.25 v1(80,49) ; P2.4@87.54,55.75 87.54,53.557 v1(88.048,53.048)
D\R\D\Y\_TERM: R14.2 R23.2 U6.13 | length 6.5
  Top Layer w0.3: R14.2@83.475,49.75 84.975,49.75 R23.2@85,49.775 ; R23.2@84.975,49.775 85.3,49.45 85.393,49.45 86,48.843 U6.13@86,45.3
DIN_TERM: P2.1 R19.2 U6.10 | length 33.7
  Top Layer w0.3: R19.2@68.525,47.525 68.646,47.525 69.121,48 72.156,48 76.856,52.7 77.644,52.7 ; P2.1@79.92,55.75 78.62,54.45 78.606,54.45 77.644,53.487 77.644,52.7 ; U6.10@87.5,45.3 87.5,48.179 88,48.679 88,51.753 86.753,53 82.25,53 81.25,52 79.594,52 79.394,51.8 78.544,51.8 77.644,52.7
DOUT_TERM: R20.2 U6.12 | length 4.5
  Top Layer w0.3: U6.12@86.5,45.3 R20.2@86.5,49.775
EIS_EN: R60.1 R67.1 R96.2 U3.12 | length 111.6
  Top Layer w0.3: U3.12@59.457,37.068 59.758,37.368 61.626,35.5 80.5,35.5 87,29 87,23 93.5,16.5 93.5,7 96.5,4 104,4 106.5,6.5 106.5,7.361 R67.1@106.623,7.484 110.001,7.484 111.132,6.353 117.353,6.353 v1(119,8) ; R60.1@116.275,30.5 116.275,28.225 118.625,25.875 ; R96.2@119.5,26.775 119.5,26.75 118.625,25.875 ; v1(120.25,12.75) 120.25,24.25 118.625,25.875
  Layer 2 w0.3: v1(119,8) 119,11.5 v1(120.25,12.75)
EIS_VBATT_N: R31.4 R63.1 TP8.1 U7.6 U7.7 | length 35
  Top Layer w0.3: R63.1@99.525,38 99.525,38.856 99.642,38.973 100.494,38.973 106.066,33.4 106.072,33.4 108.772,30.7 110.55,30.7 111.25,30 ; TP8.1@110.25,29 111.25,30 ; U7.7@112.275,18.865 U7.6@112.275,20.135 113.979,20.135 114.95,21.106 114.95,22.314 114.75,22.514 114.75,23 ; R31.4@115.65,23 114.75,23 ; 111.25,30 114.584,26.666 115.584,26.666 115.906,26.344 115.906,26.096 114.75,24.94 114.75,23
EIS_VBATT_P: R30.4 R66.1 TP9.1 U7.1 | length 37.4
  Top Layer w0.3: R66.1@99.525,40.5 99.525,39.644 99.642,39.527 100.723,39.527 109,31.25 110.778,31.25 111.514,30.514 ; TP9.1@112.5,31.5 111.514,30.514 ; U7.1@117.725,17.595 118.15,17.595 119.23,18.675 119.23,22.77 118.5,23.5 118.5,24.229 117.103,25.626 117.103,25.925 115.812,27.216 114.812,27.216 111.514,30.514
  Top Layer w0.381: R30.4@117.331,16.134 117.331,17.494 117.432,17.595 U7.1@117.725,17.595
EIS_VISENSE_N: R32.1 R44.3 R46.1 TP7.1 U8.6 | length 37.7
  Top Layer w0.3: R32.1@99.525,43 99.525,43.858 99.642,43.975 101.025,43.975 102.75,42.25 ; TP7.1@101.75,41.25 102.75,42.25 ; R46.1@107.27,38.979 107.295,38.979 107.595,38.679 107.595,37.655 v1(108.25,37) ; v1(108.25,34.75) 108.25,35.5 ; v1(115.2,33.9) 115.2,34.887 ; U8.6@116.775,34.825 116.737,34.863 116.17,34.863 116.147,34.887 115.2,34.887 ; v1(118.75,33.25) 119.4,32.6 R44.3@119.4,32 ; 102.75,42.25 103.7,41.3 103.7,38.522 106.722,35.5 108.25,35.5 ; 108.25,35.5 113.022,35.5 113.635,34.887 115.2,34.887
  Layer 2 w0.3: v1(108.25,34.75) 108.25,35.9 108.253,35.903 108.253,36.997 v1(108.25,37) ; v1(115.2,33.9) 115.85,33.25 v1(118.75,33.25)
  Bottom Layer w0.3: v1(115.2,33.9) 115.2,34.9
EIS_VISENSE_P: R34.1 R44.4 R47.1 TP6.1 U8.5 U9.6 U9.7 | length 51.4
  Top Layer w0.3: R34.1@99.525,45.5 99.525,44.642 99.642,44.525 101.253,44.525 103.139,42.639 ; TP6.1@104.25,43.75 103.139,42.639 ; U9.7@109.365,47.725 U9.6@110.635,47.725 110.635,45.865 113.25,43.25 113.25,38.979 ; R47.1@112.521,38.979 113.25,38.979 ; v1(115.2,36.25) 115.2,35.437 ; U8.5@116.775,35.475 116.453,35.475 116.414,35.437 116.17,35.437 115.2,35.437 ; R44.4@119.4,31 119.5,30.9 v1(119.5,30) ; 103.139,42.639 104.25,41.528 104.25,38.75 106.95,36.05 113.25,36.05 ; 113.25,36.05 113.25,38.979 ; 113.25,36.05 113.863,35.437 115.2,35.437
  Layer 2 w0.3: v1(115.2,36.25) 115.2,35.15 116.35,34 119.1,34 119.5,33.6 v1(119.5,30)
EIS_VRMS_N: C7.2 C8.2 R2.1 R24.1 TP1.1 U4.6 U4.7 U5.6 | length 78.2
  Top Layer w0.12: C8.2@102.917,10.775 C8.2@102.917,10.75 102.067,10.75 101.817,10.5 97,10.5 96.25,11.25 96.25,12.65 96.85,13.25 98.759,13.25 99.527,14.018 99.527,15.91 99.917,16.3 102.317,16.3 104.367,18.35 106.817,20.8 108.317,20.8 108.717,20.4 108.717,19.9 108.317,19.5 106.917,19.5 106.748,19.5 103.417,16.17 103.417,14.917 103.2,14.7 103.2,13.2 103.35,13.05 105.867,13.05 106.217,12.7 106.217,12.175 105.921,11.879 105.246,11.879 U5.6@105.192,11.825
  Top Layer w0.3: R2.1@98.692,21.5 100.402,21.5 101.767,20.135 U4.6@102.192,20.135 ; C7.2@99,6.625 100.375,6.625 101.05,7.3 101.05,7.382 101.55,7.882 101.55,9.358 102.917,10.725 C8.2@102.917,10.75 ; R24.1@99.525,33 99.583,33.058 99.583,33.903 99.7,34.02 101.23,34.02 102.5,32.75 102.5,30 ; TP1.1@101,30 102.5,30 ; C8.2@102.917,10.775 103.967,11.825 U5.6@105.192,11.825 ; 104.367,18.35 103.852,18.865 U4.7@102.192,18.865 U4.6@102.192,20.135 ; U4.6@102.192,20.135 102.617,20.135 103.251,20.768 103.251,21.677 104.127,22.553 104.127,27.873 102.5,29.5 102.5,30
EIS_VRMS_P: C9.2 R7.2 R11.2 R25.1 TP2.1 U4.1 | length 34.5
  Top Layer w0.297: 105.001,15.252 106.774,15.252 107.055,15.533
  Top Layer w0.3: R25.1@99.525,35.5 99.525,34.676 99.701,34.5 101.429,34.5 103.05,32.879 103.05,29.685 103.867,28.867 ; R11.2@104.142,15.5 104.391,15.252 105.001,15.252 ; TP2.1@105,30 103.867,28.867 ; 107.055,15.533 107.234,15.712 107.5,15.712 107.775,15.987 R7.2@107.775,16 107.642,16.133 U4.1@107.642,17.595 C9.2@109.307,17.595 ; C9.2@109.358,17.647 109.629,17.376 109.632,17.373 C9.2@109.632,17.353 ; C9.2@109.632,17.378 110.632,18.378 110.632,20.103 108.632,22.103 108.632,24.103 107.835,24.9 107.044,24.9 105.994,25.95 105.05,25.95 104.7,26.3 104.7,28.035 103.867,28.867
EL_DRIVE: C39.2 R56.2 R57.1 U10.7 | length 33.5
  Top Layer w0.3: v1(112,52) 112.004,52 112.504,52.5 113.275,52.5 113.25,52.525 R56.2@113.25,54 ; U10.7@115.865,47.725 115.865,47.3 117.031,46.134 117.366,46.134 v1(117.5,46) ; R57.1@126.5,32.225 v1(126.5,33.5)
  Layer 2 w0.3: v1(112,52) 112.189,52 112.489,51.7 115.85,51.7 117,50.55 117,46.504 117.5,46.004 v1(117.5,46) 122.55,40.95 122.55,37.45 v1(126.5,33.5)
EL_ISENSE_SE: R45.2 R51.2 U9.1 | length 12.8
  Top Layer w0.3: R45.2@107.27,40.479 107.295,40.479 108.095,41.279 U9.1@108.095,41.931 ; U9.1@108.095,42.275 108.095,43.345 108.75,44 v1(110.25,44) ; v1(112.75,45.25) 112.75,45.254 113.25,45.754 113.25,49.475 R51.2@113.275,49.5
  Layer 2 w0.3: v1(110.25,44) 111.5,44 v1(112.75,45.25)
EL_ISET_5V: R49.2 R52.2 U10.1 | length 12.1
  Top Layer w0.3: R49.2@114.275,40.5 114.295,40.5 114.595,40.8 U10.1@114.595,42.275 114.595,44.906 115,45.311 v1(115,45.5) ; v1(116,50.25) 116.134,50.116 116.384,50.116 116.7,49.8 116.975,49.8 R52.2@117.275,49.5
  Layer 2 w0.3: v1(115,45.5) 116,46.5 v1(116,50.25)
EL_ISET_B: Q1.1 R58.1 | length 4.4
  Top Layer w1: R58.1@121.5,23.5 121.5,22.375 121.575,22.3 121.7,22.3 123,21 Q1.1@123,19.78
EL_ISET_FB: R49.1 R50.2 U10.2 | length 3.3
  Top Layer w0.3: R50.2@115.725,39 R49.1@115.725,40.5 115.865,40.64 U10.2@115.865,42.275
EL_VSENSE_H: Q3.2 R38.2 R40.1 | length 11.6
  Top Layer w1: Q3.2@125.075,32.15 125.075,33.825 125.2,33.95 125.2,34.038 125.962,34.8 126.05,34.8 128,36.75 128,37.825 R38.2@128.325,38.15
  Top Layer w1.5: R38.2@128.325,38.15 130.05,38.15 130.95,39.05 130.95,39.515 130.975,39.54 R40.1@131.7,39.54
EN: D1.1 U3.38 | length 19.4
  Top Layer w0.3: D1.1@43.55,49.125 43.7,48.975 43.7,48.55 44.23,48.02 50.02,48.02 51.82,49.82 53.32,49.82 54.217,50.717 55.533,50.717 57.223,49.027 57.223,48.459 U3.38@59.103,46.579
GND: C1.2 C2.2 C3.2 C4.1 C6.1 C10.2 C11.2 C12.2 C13.2 C14.2 C16.1 C17.2 C19.1 C20.2 C21.2 C22.2 C23.2 C25.1 C26.1 C27.1 C28.1 C29.1 C30.1 C31.2 C32.2 C33.2 C34.2 C35.2 C36.2 C37.2 C38.2 C40.2 C41.2 D1.2 D2.2 D3.2 D4.2 D5.2 DS1.K DS2.K H1.1 J2.1A J2.1B J3.3 J3.6 J3.9 J3.14 J3.20 J3.25 J4.5 J4.7 J4.11 P1.3 P2.5 Q2.1 Q2.4 Q4.2 R8.2 R10.2 R15.2 R16.2 R26.2 R27.2 R28.2 R29.2 R31.3 R35.2 R41.2 R43.2 R48.1 R50.1 R53.1 R54.1 R71.2 R73.2 R75.2 R86.1 R89.2 R94.2 R97.2 RT1.1 TP10.1 TP11.1 TP12.1 TP14.1 U1.2 U1.4 U1.7 U2.2 U2.7 U3.7 U4.4 U5.1 U5.4 U6.1 U6.14 U6.17 U6.24 U6.25 U6.27 U6.28 U7.4 U8.4 U9.4 U10.4 U11.2 U12.2 U13.2 U14.5 U15.2 U15.8 U15.9 | length 188.6
  Top Layer w0.2: 36.507,38.51 36.625,38.628 U15.2@36.625,39.21 ; 36.625,41.71 U15.9@36.625,41.01 U15.8@37.075,41.01 ; U1.2@126.005,59 U1.7@127,59 ; U1.4@127.995,58.35 128.96,58.35 C1.2@129,58.31 129.06,58.25 v1(129.91,58.25)